# Altium PCB Wearable_ECG_230108U_230507R.PcbDoc (part 2 of 2)
Units mil, origin at the board's own origin, x right, y up, seen from the top; angles counter-clockwise.
Board outline 3795 x 1445 mil, 4 copper layers (Top Layer, L2_GND, L3_POWER, Bottom Layer), stack 62.449 mil thick; 68 components, 46 nets, 244 pads, 65 vias.
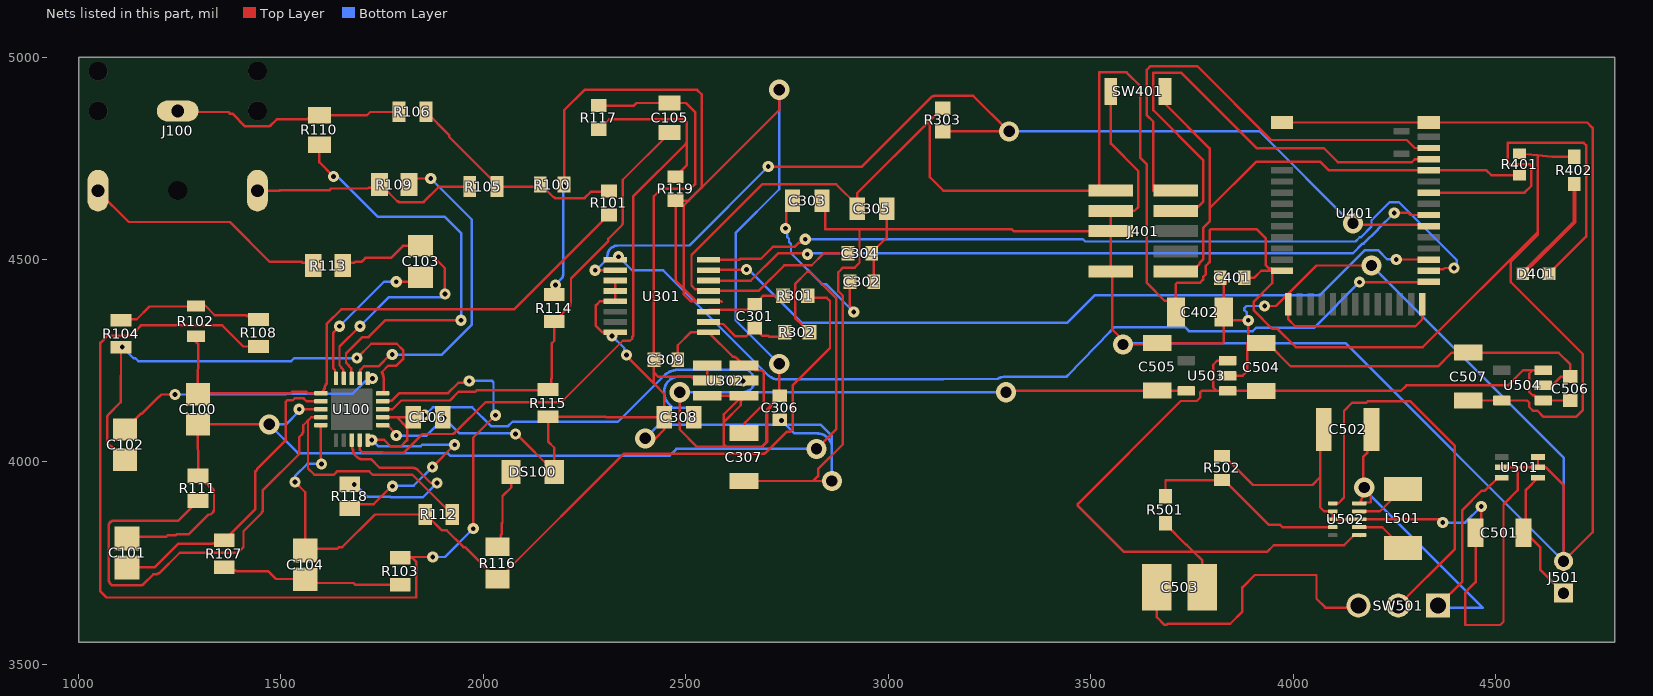
[diagram p4: the nets of this part, all layers, seen from the top]

## Via types
v1: diameter 27.56, hole 11.81, Top Layer to Bottom Layer, 52 vias
v2: diameter 50, hole 28, Top Layer to Bottom Layer, 13 vias

## Nets (pads, with @x,y where several pads share a name; then routed paths per layer and width w, separated by ;. In a path a pad name is that pad's centre, name@x,y a point inside that pad or via, vN(x,y) a via of type N, cw(c..) or ccw(c..) an arc to the next point about the centre after c; other vN are vias at no path point)
3.3V: C106.1 C302.1 C303.1 C306.2 C505.2 R100.1 R114.1 R118.1 R119.2 U100.15 U100.17 U301.12 U302.3 U302.4 U503.5 | length 7587.3
  Top Layer w6: R118.1@1670,3885.42 1678.15,3893.7 1682.09,3893.7 1683.07,3894.68 1696.85,3894.68 1697.83,3895.67 1729.33,3895.67 1773.62,3939.96 v1(1775.59,3939.96) ; U100.15@1714.37,4053.82 1714.37,4053 1714.57,4053.15 1715.55,4054.13 v1(1724.41,4054.13) ; U100.15@1716.54,4055.12 1717.52,4055.12 1718.5,4056.1 1720.47,4056.1 v1@1721.46,4057.09 ; v1@1724.41,4057.09 1727.36,4054.13 1755.21,4054.13 1771.12,4038.22 1796.09,4038.22 1811.78,4053.91 1811.78,4085.22 1786.72,4110.28 ; U100.17@1751.18,4110.32 1786.72,4110.28 ; C106.1@1826.77,4110.32 1826.77,4110.24 1816.93,4110.25 1815.94,4110.25 1813.01,4110.25 1786.72,4110.28 ; C106.1@1826.77,4113.19 1853.35,4113.19 v1(1855.32,4115.16) ; v1(1874.02,3987.2) v1(1929.13,4042.32) ; R114.1@2175,4413.5 2175.2,4434.06 v1(2178.15,4437.01) ; v1(2197.83,4681.1) 2197.83,4683.07 2199.8,4685.04 R100.1@2199.53,4685 2199.53,4868.53 2250,4919 2528,4919 2539,4908 2539,4677.47 2507,4645.47 R119.2@2475,4645.47 2475,4448 2495,4428 ; v2@2489.17,4170.28 2487.2,4170.28 2485.24,4172.24 v2(2485,4172) 2485,4080 2528,4037 2594,4037 ; U302.3@2553.11,4163.39 U302.4@2640,4163.39 ; 2588,4397 2526,4397 2495,4428 ; 2588.58,4395.67 U301.12@2555.94,4396.65 2512,4396.65 2495,4413.65 2495,4428 ; v2(2731,4242) C306.2@2731,4161.61 ; v2(2731,4919) 2731,4869 2495,4633 2495,4428 ; v1(2746.58,4576.87) 2747.88,4578.17 2747.88,4629.3 C303.1@2763.58,4645 ; C302.1@2905.47,4445 2905.47,4385.36 2915,4375.83 v1(2915,4370) ; v2(3291,4172) 3294.2,4175.2 U503.5@3736.22,4175.2 ; 2594,4037 2594,4117.39 U302.4@2640,4163.39 ; 2594,4037 2689,4037 2701,4049 2701,4129 C306.2@2724.14,4152.14 ; U302.4@2640,4163.39 U302.4@2643.7,4163.39 2639.76,4159.45 2639.76,4157.48 2637.8,4155.51 2637.8,4151.57 2635.83,4149.61 2635.83,4139.76 2594.49,4098.43 2594.49,4043.31 2600.39,4037.4 2687.01,4037.4 2698.82,4049.21 2698.82,4124.02 2700.79,4125.98 2700.79,4127.95 2702.76,4127.95 2702.76,4129.92 2704.72,4129.92 2704.72,4131.89 2706.69,4131.89 2706.69,4133.86 2708.66,4133.86 2708.66,4135.83 2710.63,4137.8 2710.63,4141.73 C306.2@2732.28,4163.39 C306.2@2731,4161.61 ; C306.2@2724.14,4152.14 2731,4159 C306.2@2731,4161.61 ; C306.2@2724.14,4152.14 C306.2@2731,4161.61
  Bottom Layer w6: v1(1724.41,4054.13) 1724.8,4054.13 1740.71,4038.22 1844.49,4038.22 1848.59,4042.32 v1(1929.13,4042.32) ; v1(1775.59,3939.96) 1776.57,3940.94 1827.76,3940.94 v1(1874.02,3987.2) ; v1(1855.32,4115.16) 1875.2,4135.05 1972.08,4135.05 2018.91,4088.22 2061.18,4088.22 2071.95,4099 2332.27,4099 2449.8,4216.54 2450.79,4216.54 2452.76,4218.5 2453.74,4218.5 2454.72,4219.49 2455.71,4219.49 2457.68,4221.46 2458.66,4221.46 2459.65,4222.44 2460.63,4222.44 2461.61,4223.43 2463.58,4223.43 2464.57,4224.41 2466.54,4224.41 2467.52,4225.39 2469.49,4225.39 2470.47,4226.38 2474.41,4226.38 2475.39,4227.36 2653.54,4227.36 2664.37,4216.54 2664.37,4215.55 2665.35,4214.57 2665.35,4213.58 2666.34,4212.6 2666.34,4211.61 2667.32,4210.63 2667.32,4209.65 2668.31,4208.66 2668.31,4204.72 2669.29,4203.74 2669.29,4195.87 2668.31,4194.88 2668.31,4190.94 2667.32,4189.96 2667.32,4188.98 2666.34,4187.99 2666.34,4187.01 2665.35,4186.02 2665.35,4185.04 2664.37,4184.06 2664.37,4183.07 2658.46,4177.17 2657.48,4177.17 2656.5,4176.18 2655.51,4176.18 2654.53,4175.2 2653.54,4175.2 2652.56,4174.21 2651.57,4174.21 2650.59,4173.23 2646.65,4173.23 2645.67,4172.24 2491.14,4172.24 2490.9,4172 v2(2485,4172) ; v1(2178.15,4437.01) 2178.15,4437.99 2195.87,4455.71 2195.87,4459.65 2197.83,4461.61 v1(2197.83,4681.1) ; 2650.59,4172 v2(3291,4172) ; v2(2731,4242) 2623.22,4349.78 2623.22,4565.75 2731,4673.53 v2(2731,4919) ; v1(2746.58,4576.87) 2750.7,4572.74 2750.7,4555.32 2754.94,4551.09 2754.94,4543.47 2760,4538.41 2760,4515.26 2836.24,4439.02 2845.98,4439.02 v1(2915,4370)
ADC_CS: R303.1 U301.2 U401.30 | length 2590.2
  Top Layer w6: v1@2278.54,4473.43 U301.2@2325.94,4473.43 ; v1(2703.74,4729.33) 2935.04,4729.33 3108.27,4902.56 3109.25,4902.56 3110.24,4903.54 3112.2,4903.54 3113.19,4904.53 3209.65,4904.53 3298.23,4815.94 v2(3298.72,4816.28) R303.1@3135,4816.28 ; v2(4148.34,4589.15) 4151.76,4585.74 4331.59,4585.74 U401.30@4335,4582.32
  Bottom Layer w6: v1@2278.54,4473.43 2306.1,4500.98 2306.1,4510.83 2307.09,4511.81 2307.09,4515.75 2308.07,4516.73 2308.07,4517.72 2309.06,4518.7 2309.06,4519.69 2310.04,4520.67 2310.04,4521.65 2311.02,4522.64 2311.02,4523.62 2316.93,4529.53 2317.91,4529.53 2318.9,4530.51 2319.88,4530.51 2320.87,4531.5 2321.85,4531.5 2322.83,4532.48 2323.82,4532.48 2324.8,4533.46 2328.74,4533.46 2329.72,4534.45 2508.86,4534.45 v1(2703.74,4729.33) ; v2(3298.72,4816.28) 3917.72,4816.28 4144.85,4589.15 v2(4148.34,4589.15)
  other v1: 2276.18,4473.43
ADC_DRDY: U301.14 U401.31 | length 1852.6
  Top Layer w6: U301.14@2555.94,4447.83 2660.71,4447.83 2727.87,4515 2798.13,4515 v1(2800.31,4512.82) ; v1(4250,4615) 4285.08,4615 4290.2,4609.88 U401.31@4335,4609.88
  Bottom Layer w6: v1(2800.31,4512.82) 2802.49,4515 4147.63,4515 4171.63,4539 4174.56,4539 4209.96,4574.4 4209.96,4574.96 v1(4250,4615)
DVDD_3V3: C304.1 C305.1 C401.1 C402.2 C507.1 J401.1 R303.2 R401.2 R402.2 U301.13 U401.11 U504.5 | length 5714.5
  Top Layer w6: C304.1@2900.47,4515 2840.37,4515 2811.1,4485.74 2743.58,4485.74 2680.09,4422.24 U301.13@2555.94,4422.24 2551.96,4426.23 2523.4,4426.23 2514.16,4435.47 2514.16,4511.39 2688.34,4685.56 2871.88,4685.56 C305.1@2923.58,4633.86 ; C305.1@2923.58,4625 C305.1@2923.58,4633.86 ; R303.2@3135,4873.72 3133.06,4873.72 3103,4843.65 ; J401.1@3549.88,4670 J401.1@3521,4670 ; C402.2@3710.95,4370 3710.95,4376.05 3710.05,4376.95 C402.2@3710.05,4379.38 ; C402.2@3726.65,4384 C402.2@3726.65,4384.76 ; C401.1@3879.53,4455 3904.53,4455 3921.62,4472.09 U401.11@3953,4472.09 ; U401.11@3972.8,4472.09 U401.11@3953.11,4472.09 ; C507.1@4433.07,4151.57 U504.5@4515.75,4151.57 4578.43,4151.57 4583.46,4146.54 4583.46,4135.55 4592.25,4126.76 4603.24,4126.76 4619,4111 4699,4111 4716,4128 4716,4266 4538,4444 4538,4494 4604.99,4560.99 4604.99,4567.99 ; R401.2@4560,4761.64 4603.81,4757.16 ; R402.2@4695,4753.46 4640,4753.46 4603.81,4757.16 ; C305.1@2923.58,4633.86 2923.58,4664.24 3103,4843.65 ; 3103,4843.65 3103,4703 3136,4670 J401.1@3521,4670 ; J401.1@3521,4670 3521,4962 3589,4962 3623,4928 3623,4751 3639,4735 3639,4441.95 3682.82,4398.12 3691.31,4398.12 C402.2@3710.05,4379.38 ; C402.2@3710.05,4379.38 3710.05,4438.92 3713.56,4442.43 3770.42,4442.43 3778.04,4450.05 3778.04,4456.41 3785,4463.37 3785,4484.38 3794.04,4493.42 3794.04,4546.58 3794.04,4571.49 3797.55,4575 3910,4575 3932.24,4552.76 3932.24,4486.39 3939.85,4478.77 3944.72,4478.77 3946.43,4478.77 U401.11@3953.11,4472.09 ; U401.11@3953.11,4472.09 3948.33,4467.31 3948.33,4441.21 3903.22,4396.09 3903.22,4373.91 3948.67,4328.45 3961.55,4328.45 4007,4283 4320,4283 4604.99,4567.99 ; 4603.81,4757.16 4604.99,4755.98 4604.99,4567.99
GND: C105.2 C106.2 C302.2 C303.2 C304.2 C305.2 C306.1 C307.1 C308.2 C309.1 C401.2 C402.1 C501.2 C502.1 C503.1 C504.2 C505.1 C506.2 C507.2 DS100.2 J401.3 J401.5 J401.9 J501.2 R115.1 R117.2 R502.1 SW401.2 SW501.3 U100.16 U301.3 U301.4 U301.5 U301.8 U302.1 U302.2 U401.1 U401.12 U401.24 U401.39 U501.2 U501.3 U501.5 U502.2 U502.3 U502.8 U503.2 U504.2 | length 15492.7
  Top Layer w6: U100.16@1751.18,4090.63 1762.6,4090.63 1785,4068.23 v1(1785,4065) ; C106.2@1899.61,4110.32 1901.57,4108.27 v1(1902.56,4108.27) ; v1(2079.72,4068.9) 2081.69,4068.9 DS100.2@2175,3975.59 ; R117.2@2285,4880 2372,4880 2378.42,4886.42 C105.2@2460,4886.42 2500.58,4886.42 2523,4864 2523,4686 2512,4675 2440.26,4675 2421.26,4656 C309.1@2421.26,4251.97 2421.26,4220.74 ; v1(2317.91,4311.02) 2323.82,4316.93 2323.82,4317.91 U301.8@2325.94,4319.88 2294.12,4319.88 2278,4336 2278,4386.65 2288,4396.65 U301.5@2325.94,4396.65 U301.4@2325.94,4422.24 U301.3@2325.94,4447.83 ; v1(2353.35,4263.78) 2353.35,4261.81 2421.26,4193.9 2421.26,4193.59 ; v2(2400,4058) 2424.85,4058 2446.85,4080 C308.2@2446.85,4110.24 ; U302.1@2553.11,4238.19 U302.2@2553.11,4200.79 2523,4200.79 2513.79,4210 2432,4210 2421.26,4220.74 ; C307.1@2643.7,3952.76 2814.76,3952.76 ; C306.1@2732.28,4104.33 2734.25,4102.36 v1(2736.22,4102.36) ; C303.2@2836.42,4645 2844.49,4636.93 2844.49,4575 2929.22,4575 ; v2(2861,3952.76) 2814.76,3952.76 ; C304.2@2959.53,4515 2964.53,4510 C302.2@2964.53,4445 ; C304.2@2959.53,4516.97 2996.42,4553.86 2996.42,4575 ; C305.2@2996.42,4625 2996.42,4575 ; SW401.2@3550,4915 3550,4786 3618,4718 3618,4630 3608,4620 J401.3@3549.88,4620 J401.5@3549.88,4570 ; C503.1@3663.89,3690 3663.89,3616.11 3682.51,3597.49 3687.49,3597.49 3690,3600 3845,3600 3875,3630 3875,3690 3905.47,3720.47 4058.05,3720.47 4058.05,3661.95 4080,3640 4156.58,3640 SW501.3@4161.58,3645 ; C505.1@3665,4293.31 3825.54,4293.31 3829.06,4296.82 C402.1@3829.06,4369.27 ; C505.1@3665,4294.06 3660.94,4290 v2(3580,4290) 3580,4300.33 3554,4326.33 3554,4465.88 J401.9@3549.88,4470 J401.5@3549.88,4570 ; R502.1@3825,4014.53 3829.92,4014.53 3901.53,3942.91 4048,3942.91 4066.93,3961.84 ; C401.2@3835.47,4445 3829.06,4438.58 C402.1@3829.06,4370 C402.1@3829.06,4369.27 ; U503.2@3838.58,4212.6 3875.6,4212.6 3887,4224 3887,4293.31 C504.2@3906.31,4293.31 ; v1(3930,4385) 3957.88,4385 4057.88,4485 v2(4194,4485) ; U401.1@3960,4838.23 U401.1@3972.8,4838.23 U401.39@4335,4838.23 4726.77,4838.23 4740,4825 4740,3826.02 J501.2@4668.35,3754.37 4668.35,3942.65 4624.58,3986.42 U501.2@4605.24,3986.42 ; U401.12@3988.54,4389.41 3988.54,4352 4005.54,4335 4302.25,4335 4319.25,4352 U401.24@4319.25,4389.41 ; C502.1@4066.93,4027.56 4066.93,3961.84 ; v1(4370,3850) 4370,3855 4368.63,3856.37 4366.73,3858.27 U502.8@4155.51,3858.27 U502.3@4098.43,3858.27 U502.2@4098.43,3877.95 4076.98,3877.95 4066.93,3888 4066.93,3961.84 ; v1(4465,3890) 4465,3839.06 C501.2@4450.94,3825 4450.94,3702.82 4425,3676.87 4425,3597 4512,3597 4520,3605 4520,3895 4555,3930 4555,3985 ; U501.5@4515.74,3986.42 U501.2@4605.24,3986.42 ; U501.3@4605.24,4012.01 U501.2@4605.24,3986.42 ; U504.2@4618.11,4188.98 4640,4188.98 4661.65,4210.63 C506.2@4685.04,4210.63 4685.04,4240.65 4656,4269.69 C507.2@4433.07,4269.69 4391.69,4269.69 4358,4236 3994.31,4236 3937,4293.31 C504.2@3921.26,4293.31 C504.2@3906.31,4293.31 ; DS100.2@2175,3975.59 DS100.2@2175,3975 2175.2,3975.39 DS100.2@2175,3975.59 ; DS100.2@2175,3975.59 2175,4035 2160,4050 R115.1@2160,4111.5 2302,4111.5 2303.27,4110.24 C308.2@2446.85,4110.24 ; 2421.26,4193.59 2446.85,4168 C308.2@2446.85,4110.24 ; 2421.26,4193.59 2421.26,4220.74 ; 2814.76,3952.76 2827,3965 2827,3982.26 2888.22,4043.48 2888.22,4410.4 2876.72,4421.9 2876.72,4468.1 2888.62,4480 2917.32,4480 2929.22,4491.9 2929.22,4575 ; 2929.22,4575 2996.42,4575 ; 2996.42,4575 3305,4575 3310,4570 J401.5@3549.88,4570 ; C402.1@3829.06,4369.27 3848.69,4349.63 3884.26,4349.63 3889.63,4355 v1(3889.63,4349.63) 3889.63,4309.99 C504.2@3906.31,4293.31
  Bottom Layer w6: v1(1785,4065) 1859.29,4065 v1(1902.56,4108.27) 1939.96,4070.87 2077.76,4070.87 v1(2079.72,4068.9) ; v1(2317.91,4311.02) 2348.43,4280.51 2348.43,4268.7 v1(2353.35,4263.78) ; v2(2400,4058) 2434,4092 2746.58,4092 ; v1(2736.22,4102.36) 2746.58,4092 ; v2(3580,4290) 3583.31,4293.31 4129.41,4293.31 J501.2@4668.35,3754.37 4668.35,4010.65 v2(4194,4485) ; v1(3889.63,4349.63) 3885.5,4353.75 3885.5,4369.53 3880,4375.03 3880,4380 3885,4385 v1(3930,4385) ; v1(4370,3850) 4425,3850 v1(4465,3890) ; 2746.58,4092 2833,4092 2861,4064 2861,4040.57 ; 2746.58,4092 2767.72,4070.87 2826.77,4070.87 2827.76,4069.88 2832.68,4069.88 2833.66,4068.9 2835.63,4068.9 2836.61,4067.91 2838.58,4067.91 2839.57,4066.93 2840.55,4066.93 2841.54,4065.94 2842.52,4065.94 2843.5,4064.96 2844.49,4064.96 2847.44,4062.01 2848.43,4062.01 2853.35,4057.09 2853.35,4056.1 2855.32,4054.13 2855.32,4053.15 2857.28,4051.18 2857.28,4050.2 2858.27,4049.21 2858.27,4048.23 2859.25,4047.24 2859.25,4045.28 2860.24,4044.29 2860.24,4041.34 2861,4040.57 ; 2861,4040.57 2861.22,4040.35 2861.22,3952.76 v2(2861,3952.76) 2861,4040.57
MCU_RESET_N: J401.10 R401.1 SW401.1 U401.35 | length 1376
  Top Layer w6: SW401.1@3683.86,4915 3683.86,4884.53 3794.04,4774.35 3794.04,4626.43 ; J401.10@3710.12,4470 3750.47,4470 3769,4488.53 3769,4491.01 3778.04,4500.05 3778.04,4539.95 3778.04,4578.11 3794.04,4594.11 3794.04,4626.43 ; R401.1@4560,4708.36 4489.76,4708.36 4478,4720.12 U401.35@4335,4720.12 4088.88,4720.12 4068,4741 3908.61,4741 3794.04,4626.43
MCU_STATUS_LED: D401.1 U401.33 | length 975.4
  Top Layer w6: U401.33@4335,4665 4571.99,4665 4588.99,4682 4588.99,4735 4531,4735 4531,4788 4718,4788 4724,4782 4724,4556.52 D401.1@4632.48,4465
NetC100_1: C100.1 R101.2 R102.2 U100.6 | length 1440.5
  Top Layer w6: R102.2@1290,4310.2 1289.37,4311.02 1289.37,4297.24 1295.28,4291.34 C100.1@1295,4167.4 1295.28,4167.32 1297.24,4169.29 1523.79,4169.29 1527.28,4172.78 1562.72,4172.78 1566.14,4169.36 U100.6@1598.82,4169.37 1606.3,4177.17 1606.3,4179.13 1608.27,4181.1 1608.27,4187.01 1610.24,4188.98 1610.24,4190.94 1612.75,4193.46 1612.75,4340.62 1648.91,4376.78 2075.6,4376.78 2309.05,4610.24 R101.2@2310,4610
NetC101_2: C101.2 R107.2 U100.7 | length 766
  Top Layer w6: C101.2@1120,3739.34 1120.08,3740.16 1188.98,3740.16 1246.06,3797.24 1330.71,3797.24 1332.68,3799.21 1346.46,3799.21 1348.43,3801.18 1352.36,3801.18 1354.33,3803.15 1356.3,3803.15 R107.2@1360,3806.93 1360.24,3807.09 1437.01,3883.86 1437.01,3976.38 1440.94,3980.32 1440.94,3982.28 1511.52,4052.86 1511.52,4147.74 1516.04,4152.26 1529.39,4152.26 1533.91,4156.78 1556.09,4156.78 1563.19,4149.69 U100.7@1598.82,4149.69
NetC102_1: C102.1 U100.1 | length 675.6
  Top Layer w6: C102.1@1115,4080 1154.53,4119.09 1156.5,4119.09 1197.83,4160.43 1198.82,4160.43 1204.72,4166.34 v1(1238.19,4166.34) ; U100.1@1714.37,4206.18 1714.57,4205.71 v1(1726.38,4205.71)
  Bottom Layer w6: v1(1238.19,4166.34) 1511.81,4166.34 1513.78,4168.31 1677.17,4168.31 1708.66,4199.8 1720.47,4199.8 v1(1726.38,4205.71)
NetC102_2: C102.2 R104.1 U100.20 | length 1191.6
  Top Layer w6: v1(1108.27,4283.46) R104.1@1105,4283 1104.33,4147.64 1072.83,4116.14 1072.83,4114.17 1070.87,4112.2 1070.87,4047.24 1072.83,4045.28 1072.83,4043.31 1076.77,4039.37 1078.74,4039.37 1080.71,4037.4 1082.68,4037.4 1114.17,4005.91 C102.2@1115,4005.2 ; v1(1687.53,4256.34) 1722.97,4291.78 1786.09,4291.78 1801.78,4276.09 1801.78,4253.91 1785.55,4237.68 1765.24,4237.68 1749.02,4221.46 1750,4220.47 1750,4219.49 1750.98,4218.5 1750.98,4217.52 1751.97,4216.54 1751.97,4215.55 1752.95,4214.57 1752.95,4210.63 1753.94,4209.65 1753.94,4172.24 1750.98,4169.29 U100.20@1751.18,4169.37
  Bottom Layer w6: v1(1108.27,4283.46) 1135.83,4255.91 1140.75,4255.91 1147.64,4249.02 1525.59,4249.02 1532.91,4256.34 v1(1687.53,4256.34)
NetC103_1: C103.1 R113.2 U100.4 | length 755.2
  Top Layer w6: R113.2@1652.83,4485 1659.45,4490.16 1665.35,4490.16 1667.32,4492.13 1681.1,4492.13 1683.07,4494.09 1698.82,4494.09 1708.66,4503.94 1771.65,4503.94 1801.18,4533.46 1849.84,4533.46 1905,4478.31 v1(1905,4415) ; U100.4@1655.32,4206.18 1653.75,4207.75 1653.75,4228.19 1649.51,4232.43 1649.51,4233.85 1644.75,4238.62 1644.75,4284.75 v1(1695,4335)
  Bottom Layer w6: v1(1695,4335) 1767.06,4407.06 1897.06,4407.06 v1(1905,4415)
NetC103_2: C103.2 U100.5 | length 388.4
  Top Layer w6: U100.5@1635.63,4206.18 1633.51,4208.3 1633.51,4227.22 1628.75,4231.99 1628.75,4318.75 v1(1645,4335) ; v1(1785,4445) 1834.37,4445 C103.2@1845,4455.63
  Bottom Layer w6: v1(1645,4335) 1755,4445 v1(1785,4445)
NetC104_2: C104.2 R103.1 R107.1 | length 453.5
  Top Layer w6: R107.1@1360,3740 1364.17,3736.22 1366.14,3736.22 1368.11,3734.25 1372.05,3734.25 1374.02,3732.28 1387.8,3732.28 1389.76,3730.32 1468.5,3730.32 1488.19,3710.63 1559.06,3710.63 C104.2@1560,3710 1562.99,3706.69 1564.96,3706.69 1566.93,3704.72 1570.87,3704.72 1572.83,3702.76 1586.61,3702.76 1588.58,3700.79 1679.13,3700.79 1683.07,3696.85 1795.28,3696.85 R103.1@1795,3696.54
NetC105_1: C105.1 R114.2 R115.2 U100.18 | length 1189.4
  Top Layer w6: U100.18@1751.18,4130 1775.59,4129.92 1797.24,4151.57 1917.32,4151.57 1938.98,4173.23 1980.32,4173.23 1984.25,4177.17 2157.48,4177.17 2159.45,4179.13 R115.2@2160,4178.5 2165.35,4185.04 2165.35,4190.94 2167.32,4192.91 2167.32,4204.72 2169.29,4206.69 2169.29,4293.31 2175.2,4299.21 2175.2,4346.46 R114.2@2175,4346.5 2214.57,4385.83 2214.57,4391.73 2216.54,4393.7 2216.54,4452.76 2309.06,4545.28 2309.06,4551.18 2342.52,4584.65 2342.52,4586.61 2344.49,4588.58 2344.49,4696.85 2460.63,4812.99 C105.1@2460,4813.58
NetC301_1: C301.1 R301.2 U301.11 | length 204.1
  Top Layer w6: U301.11@2555.94,4371.06 2555.12,4372.05 2559.06,4375.98 2651.77,4375.98 2652.57,4376.78 2656.78,4376.78 C301.1@2670,4390 ; C301.1@2670,4389.53 2671.97,4389.53 2684.72,4402.28 2684.72,4404.24 2690.47,4410 R301.2@2740.84,4410
NetC301_2: C301.2 R302.2 U301.10 | length 216.3
  Top Layer w6: U301.10@2555.94,4345.47 2555.12,4344.49 2557.09,4342.52 2582.68,4342.52 2584.65,4340.55 2592.52,4340.55 2623.07,4310 2649.53,4310 2655.28,4315.76 2655.28,4317.72 2668.03,4330.47 2671.97,4330.47 2684.72,4317.72 2684.72,4315.76 2689.45,4311.02 2703.98,4311.02 2705.95,4309.06 R302.2@2736.22,4309.06
NetC308_1: C308.1 U302.5 | length 340.4
  Top Layer w6: v1(2515.75,4121.06) 2515.75,4117.13 2516.73,4116.14 2516.73,4114.17 2517.72,4113.19 2517.72,4112.2 C308.1@2519.69,4110.24 ; v1(2641.73,4199.8) 2642.72,4199.8 U302.5@2643.7,4200.79
  Bottom Layer w6: v1(2515.75,4121.06) 2502.95,4133.86 2467.52,4133.86 2455.71,4145.67 2455.71,4146.65 2452.76,4149.61 2452.76,4150.59 2450.79,4152.56 2450.79,4153.54 2449.8,4154.53 2449.8,4156.5 2448.82,4157.48 2448.82,4158.46 2447.83,4159.45 2447.83,4162.4 2446.85,4163.39 2446.85,4181.1 2447.83,4182.09 2447.83,4184.06 2448.82,4185.04 2448.82,4187.01 2449.8,4187.99 2449.8,4188.98 2450.79,4189.96 2450.79,4190.94 2451.77,4191.93 2451.77,4192.91 2453.74,4194.88 2453.74,4195.87 2461.61,4203.74 2462.6,4203.74 2463.58,4204.72 2464.57,4204.72 2466.54,4206.69 2467.52,4206.69 2468.5,4207.68 2470.47,4207.68 2471.46,4208.66 2473.43,4208.66 2474.41,4209.65 2478.35,4209.65 2479.33,4210.63 2630.91,4210.63 v1(2641.73,4199.8)
NetD401_2: D401.2 R402.1 | length 274.3
  Top Layer w10: D401.2@4567.52,4465 4695,4592.48 R402.1@4695,4686.54
NetDS100_1: DS100.1 R116.1 | length 198.5
  Top Layer w6: R116.1@2035,3790.42 2039.37,3795.28 2039.37,3797.24 2041.34,3799.21 2041.34,3803.15 2043.31,3805.12 2043.31,3818.9 2045.28,3820.87 2045.28,3848.43 2047.24,3850.39 2047.24,3915.35 2068.9,3937.01 2068.9,3974.41 DS100.1@2068.7,3975
NetJ100_1: J100.1 R106.1 R110.1 | length 579.3
  Top Layer w6: J100.1@1245,4866.85 1244.09,4866.14 1246.06,4864.17 1370.08,4864.17 1374.02,4860.24 1379.92,4860.24 1411.42,4828.74 1470.47,4828.74 1472.44,4830.71 1474.41,4830.71 1490.16,4846.46 1564.96,4846.46 1566.93,4848.43 1580.71,4848.43 1582.68,4850.39 1586.61,4850.39 1588.58,4852.36 1590.55,4852.36 R110.1@1595,4856.42 1712.6,4856.3 1720.47,4864.17 1791.34,4864.17 R106.1@1791.5,4865
NetJ100_2: J100.2 R113.1 | length 610.2
  Top Layer w6: J100.2@1048.15,4670 1047.24,4669.29 1124.02,4592.52 1374.02,4592.52 1472.44,4494.09 1551.18,4494.09 1553.15,4492.13 1566.93,4492.13 1568.9,4490.16 1572.83,4490.16 1574.8,4488.19 1576.77,4488.19 R113.1@1580,4485
NetJ100_3: J100.3 R105.1 R109.1 | length 567.5
  Top Layer w6: J100.3@1441.85,4670 1440.94,4669.29 1496.06,4669.29 1498.03,4671.26 1620.08,4671.26 1624.02,4675.2 1714.57,4675.2 1716.54,4677.17 1730.32,4677.17 1732.28,4679.13 1736.22,4679.13 1738.19,4681.1 1740.16,4681.1 R109.1@1743.58,4685 1748.03,4681.1 1750,4681.1 1787.4,4643.7 1789.37,4643.7 1791.34,4641.73 1852.36,4641.73 1889.76,4679.13 1966.54,4679.13 R105.1@1966.5,4680
NetL501_1: L501.1 U502.7 | length 129.5
  Top Layer w6: U502.7@4163.39,3838.58 4220.47,3838.58 L501.1@4271.65,3787.4
NetL501_2: L501.2 U502.9 | length 131.1
  Top Layer w6: U502.9@4163.39,3877.95 4214.57,3877.95 4267.72,3931.1 4269.69,3931.1 L501.2@4271.65,3933.07
NetR100_2: R100.2 R101.1 R105.2 R106.2 | length 559.3
  Top Layer w6: R106.2@1858.5,4865 1915.35,4807.09 1915.35,4803.15 2029.53,4688.98 2029.53,4687.01 2031.5,4685.04 2031.5,4681.1 2033.46,4679.13 R105.2@2033.5,4680 2133.86,4679.13 2139.76,4685.04 R100.2@2140.47,4685 2153.54,4671.26 2155.51,4671.26 2173.23,4653.54 2175.2,4653.54 2177.17,4651.57 2250,4651.57 2265.75,4667.32 2307.09,4667.32 2309.06,4669.29 R101.1@2310,4669.06
NetR102_1: R102.1 R104.2 R108.2 | length 371.3
  Top Layer w6: R104.2@1105,4350 1104.33,4350.39 1106.3,4352.36 1143.7,4352.36 1175.2,4383.86 1287.4,4383.86 R102.1@1290,4385 1289.37,4385.83 1312.99,4385.83 1336.61,4362.2 1415.35,4362.2 1417.32,4360.24 1431.1,4360.24 1433.07,4358.27 1437.01,4358.27 1438.98,4356.3 1440.94,4356.3 R108.2@1445,4352
NetR103_2: R103.2 R108.1 U100.19 | length 2854.3
  Top Layer w6: R108.1@1445,4285 1407,4285 1355,4337 1154,4337 1129,4312 1072,4312 1054,4294 1054,3680 1069,3665 1834,3665 1834,3753.46 1824,3763.46 R103.2@1795,3763.46 1796.54,3765 v1(1875,3765) ; U100.19@1751.18,4149.69 1752.75,4151.25 1774.29,4151.25 1793.04,4170 1913.12,4170 1938.12,4195 1960,4195 v1(1965,4200.01) ; v1(1975,3835) 1975,4060 v1(2030,4115)
  Bottom Layer w6: v1(1875,3765) 1905,3765 v1(1975,3835) ; v1(1965,4200.01) 2021.49,4200.01 2025,4196.49 2025,4120 v1(2030,4115)
NetR109_2: R109.2 U100.2 | length 806.6
  Top Layer w6: U100.2@1694.69,4206.18 1696.25,4207.75 1696.25,4227.35 1704.62,4235.72 1740.65,4235.72 1769.93,4265 v1(1775,4265) ; R109.2@1816.42,4685 1831.42,4700 v1(1870,4700)
  Bottom Layer w6: v1(1775,4265) 1897.87,4265 1971.78,4338.91 1971.78,4598.22 v1(1870,4700)
NetR110_2: R110.2 U100.3 | length 1068.8
  Top Layer w6: R110.2@1595,4783.58 1595,4740 v1(1630,4705) ; U100.3@1675,4206.18 1673.43,4207.75 1673.43,4231.14 1667.63,4236.94 1667.63,4238.36 1660.75,4245.24 1660.75,4267.43 1701.54,4308.22 1716.73,4308.22 1758.51,4350 v1(1945,4350)
  Bottom Layer w6: v1(1630,4705) 1632.51,4707.51 1637.49,4707.51 1740,4605 1905,4605 1945,4565 v1(1945,4350)
NetR111_1: R111.1 R112.2 U100.9 | length 1704.2
  Top Layer w6: R111.1@1295,3904.45 1295.28,3903.54 1246.06,3854.33 1082.68,3854.33 1080.71,3852.36 1078.74,3852.36 1076.77,3850.39 1076.77,3848.43 1074.8,3846.46 1074.8,3704.72 1076.77,3702.76 1076.77,3700.79 1082.68,3694.88 1155.51,3694.88 1157.48,3696.85 1159.45,3696.85 1185.04,3722.44 1194.88,3722.44 1196.85,3724.41 1198.82,3724.41 1250,3775.59 1391.73,3775.59 1393.7,3777.56 1395.67,3777.56 1407.48,3789.37 1407.48,3828.74 1452.76,3874.02 1452.76,3875.98 1454.72,3877.95 1454.72,3929.13 1545.28,4019.69 1545.28,4061.02 1553.15,4068.9 1553.15,4070.87 1555.12,4072.83 1555.12,4090.55 1564.96,4100.39 1566.93,4102.36 1574.8,4110.24 U100.9@1598.82,4110.32 ; 1566.93,4098.43 1566.93,3983.83 1582.54,3968.22 1630.69,3968.22 1638.86,3976.39 1718.09,3976.39 1726.23,3968.25 1825.06,3968.25 1923.23,3870.08 R112.2@1923.46,3870
NetR117_1: R117.1 R119.1 U100.14 | length 1732.5
  Top Layer w6: U100.14@1694.69,4053.82 1694.88,4029.53 1700.79,4023.62 1751.05,4023.62 1752.45,4022.22 1802.72,4022.22 1849.4,4068.9 1925.2,4068.9 1927.17,4070.87 1929.13,4070.87 2005.91,4147.64 2190.94,4147.64 2192.91,4149.61 2194.88,4149.61 2344.49,4299.21 2362.2,4299.21 2368.11,4305.12 2368.11,4309.06 2370.08,4311.02 2370.08,4655.51 2500,4785.43 2500,4787.4 ; R117.1@2285,4820.94 2285.51,4820.94 2311.02,4846.46 2494.09,4846.46 2496.06,4844.49 2498.03,4844.49 2500,4842.52 2500,4840.55 2501.97,4838.58 2501.97,4789.37 2501.97,4785.43 2501.97,4732.28 2474.41,4704.72 R119.1@2475,4704.53
NetR118_2: R118.2 U100.13 | length 516.3
  Top Layer w6: R118.2@1670,3944.58 1680.12,3944.88 v1(1681.1,3943.9) ; U100.13@1675,4053.82 1675.2,4054.13 1676.18,4053.15 1676.18,4032.48 1677.17,4031.5 1677.17,4030.51 1678.15,4029.53 1678.15,4025.59 1679.13,4024.61 1679.13,4022.64 1680.12,4021.65 1680.12,4020.67 1682.09,4018.7 1682.09,4017.72 1688.98,4010.83 1689.96,4010.83 1691.93,4008.86 1692.91,4008.86 1693.9,4007.87 1695.87,4007.87 1696.85,4006.89 1722.44,4006.89 1744.09,3985.24 1828.74,3985.24 1829.72,3984.25 1831.69,3984.25 1832.68,3983.27 1833.66,3983.27 1835.63,3981.3 1836.61,3981.3 1870.08,3947.83 v1(1885.83,3947.83)
  Bottom Layer w6: v1(1681.1,3943.9) 1683.07,3943.9 1713.58,3913.39 1770.67,3913.39 1771.65,3912.4 1850.39,3912.4 v1(1885.83,3947.83)
NetR501_1: R501.1 R502.2 U502.4 | length 501.7
  Top Layer w6: R501.1@3685,3915 3685,3954.37 3823.9,3954.37 R502.2@3825,3955.47 3829.92,3955.47 3940.9,3844.49 3968.5,3844.49 3974.41,3838.58 U502.4@4098.43,3838.58
NetSW501_2: SW501.2 U502.1 | length 1029.6
  Top Layer w6: U502.1@4098.43,3897.64 4112,3897.64 4126,3911.64 4126,4126 4146.15,4146.15 4181.15,4146.15 4185,4150 4289,4150 4400,4039 4400,3785 SW501.2@4260,3645
REFOUT: C100.2 C101.1 R111.2 R302.1 U100.8 | length 2858.7
  Top Layer w6: C101.1@1120,3810.66 1120.08,3811.02 1124.02,3814.96 1216.54,3814.96 1220.47,3818.9 1240.16,3818.9 1242.13,3820.87 1271.65,3820.87 1320.87,3870.08 1326.77,3870.08 1332.68,3875.98 1332.68,3877.95 1334.65,3879.92 1334.65,3929.13 1332.68,3931.1 1332.68,3933.07 1326.77,3938.98 1322.83,3938.98 R111.2@1295,3965.55 1295.28,3966.54 C100.2@1295,4092.6 v2(1471,4092.6) ; v1(1545,4130) U100.8@1598.82,4130 ; R302.1@2805.58,4320 2805.58,4321.05 2791.67,4334.96 2790.62,4334.96 2770,4355.58 2770,4439.75 2799.99,4469.74 2806.26,4469.74 2872.22,4403.77 2872.22,4081.22 v2(2823,4032)
  Bottom Layer w6: v1(1545,4130) 1545,4125 1512.6,4092.6 v2(1471,4092.6) 1541.82,4021.78 1911.81,4021.78 1918.04,4015.54 2460.44,4015.54 2476.9,4032 v2(2823,4032)
SIGNAL_OUT: C104.1 R112.1 R116.2 R301.1 U100.10 | length 2249
  Top Layer w6: v1(1535,3950) 1560,3925 1560,3785.43 C104.1@1560,3782.44 ; C104.1@1560,3780.87 C104.1@1560,3782.44 ; U100.10@1598.82,4090.63 1598.82,3997.5 1600,3996.32 v1(1600,3995) ; R112.1@1856.54,3870 R112.1@1856.38,3870 ; R301.1@2794.44,4405 2848.37,4405 2856.22,4397.15 2856.22,4281.22 2763.78,4188.78 2763.78,4080.71 2757.87,4074.8 2750,4074.8 2696.85,4021.65 2694.88,4021.65 2692.91,4019.69 2346.46,4019.69 2035.43,3708.66 R116.2@2035,3709.58 1954.72,3789.37 1950.79,3789.37 1909.45,3830.71 1897.64,3830.71 1860.24,3868.11 1858.27,3868.11 R112.1@1856.38,3870 ; C104.1@1560,3782.44 1562.99,3785.43 1639.76,3785.43 1643.7,3789.37 1651.57,3789.37 1732.28,3870.08 R112.1@1856.38,3870
  Bottom Layer w6: v1(1535,3950) 1535,3965 1565,3995 v1(1600,3995)
SPI_MISO: U301.15 U401.27 | length 1919.1
  Top Layer w6: U301.15@2555.94,4473.43 2556.73,4474.21 2649.21,4474.21 v1(2650,4475) ; v1(4255,4500) 4255.18,4499.82 U401.27@4335.18,4499.82 ; U401.27@4335,4499.65 U401.27@4335.35,4500
  Bottom Layer w6: v1(2650,4475) 2654.99,4475.01 2786.78,4343.22 3442.18,4343.22 3510.74,4411.78 4067.04,4411.78 4178.26,4523 4209.74,4523 4232.22,4500.52 4254.48,4500.52 v1(4255,4500)
SPI_MOSI: U301.16 U401.26 | length 2072.2
  Top Layer w6: U301.16@2555.94,4499.02 2632.32,4499.02 2635.08,4501.78 2685.68,4501.78 2714.9,4531 2768.53,4531 2779.31,4541.78 2791.49,4541.78 2795,4545.29 v1(2795,4550) ; U401.26@4335,4472.09 4338.63,4475.72 4371.56,4475.72 4374.68,4478.84 v1(4397.89,4478.84)
  Bottom Layer w6: v1(2795,4550) 3481.29,4550 3486.96,4544.32 4154.33,4544.32 4165.01,4555 4167.93,4555 4193.96,4581.03 4193.96,4596.83 4238.91,4641.78 4261.09,4641.78 4405,4497.87 4405,4490 4397.89,4482.89 v1(4397.89,4478.84)
SPI_SCK: U301.1 U401.25 | length 2247.6
  Top Layer w6: U301.1@2325.94,4499.02 v1(2333.66,4506.89) ; v1(4164.37,4443.9) 4333.66,4443.9 4334.65,4444.88 U401.25@4335,4444.53
  Bottom Layer w6: v1(2333.66,4506.89) 2367.13,4473.43 2443.9,4473.43 2704.72,4212.6 2705.71,4212.6 2708.66,4209.65 2709.65,4209.65 2710.63,4208.66 2711.61,4208.66 2712.6,4207.68 2713.58,4207.68 2714.57,4206.69 2715.55,4206.69 2716.54,4205.71 2718.5,4205.71 2719.49,4204.72 2721.46,4204.72 2722.44,4203.74 3135.83,4203.74 3136.81,4204.72 3269.68,4204.72 3270.67,4205.71 3271.65,4205.71 3272.64,4206.69 3273.62,4206.69 3274.61,4207.68 3276.57,4207.68 3277.56,4208.66 3279.53,4208.66 3280.51,4209.65 3284.45,4209.65 3285.43,4210.63 3438.46,4210.63 3440.94,4210.63 3444.46,4214.14 3547.62,4321.35 3548.13,4321.87 3559.26,4333 3732.78,4333 3742.94,4322.85 3900.72,4322.85 3909.57,4331.69 4047.19,4331.69 4052.17,4331.69 4053.92,4333.45 v1(4164.37,4443.9)
SWDCLK: J401.4 U401.36 | length 1222.2
  Top Layer w6: J401.4@3710.12,4620 3756.04,4620 3778.04,4642 3778.04,4745.6 3655.11,4868.53 3655.11,4961.47 3723.53,4961.47 3910,4775 4076,4775 4111,4740 4293.32,4740 4301,4747.68 U401.36@4335,4747.68
SWDIO: J401.2 U401.37 | length 1143.6
  Top Layer w6: J401.2@3710.12,4670 3655,4670 3655,4840 3639.11,4855.89 3639.11,4968.57 3648,4977.47 3763.53,4977.47 3946,4795 4281,4795 4300.76,4775.24 U401.37@4335,4775.24
VBAT: C501.1 J501.1 U501.1 | length 336.2
  Top Layer w6: U501.1@4605.24,3960.83 4575.24,3930.83 4575.24,3824.53 4610.24,3789.53 4610.24,3733.74 J501.1@4668.35,3675.63
VBAT_PROT: C502.2 SW501.1 U501.6 U502.10 | length 1116
  Top Layer w6: v2@4175.75,3932.75 4192,3916.5 4192,3900.5 U502.10@4163.39,3897.64 4167.32,3901.57 4167.32,3903.54 4169.29,3905.51 4169.29,3909.45 4171.26,3911.42 4171.26,3925.2 4173.23,3927.17 4173.23,4011.81 4183.07,4021.65 4183.07,4025.59 C502.2@4185.04,4027.56 ; SW501.1@4358.43,3645 4418.26,3704.83 4418.26,3881.13 4466.09,3928.96 4474.12,3928.96 4505.99,3960.83 U501.6@4507.52,3960.83
  Bottom Layer w6: v2@4175.75,3932.75 4468.5,3640 4363.43,3640 SW501.1@4358.43,3645
  other v2: 4175.75,3936.69
VBOOST_3V6: C503.2 C504.1 C506.1 R501.2 U502.6 U503.1 U503.3 U504.1 U504.3 | length 2532
  Top Layer w6: R501.2@3685,3848.07 3685,3846.1 3736.34,3794.76 3737.52,3794.76 3754.72,3777.56 ; C503.2@3776.11,3690 3776.11,3756.17 3754.72,3777.56 ; U503.3@3838.58,4250 3813,4250 3803,4240 3803,4184 3811.8,4175.2 ; C504.1@3921.26,4175.2 U503.1@3838.58,4175.2 3811.8,4175.2 ; C504.1@3922,4175.2 4266.2,4175.2 4280,4189 4531,4189 4568.38,4226.38 4592,4226.38 ; U502.6@4165.76,3816.53 U502.6@4163.39,3818.9 4151,3818.9 4126.1,3794 3952.33,3794 3935.89,3777.56 3754.72,3777.56 ; U504.3@4618.11,4226.38 4592,4226.38 ; C506.1@4685.04,4151.57 4608.27,4151.57 4595.68,4164.16 4592.25,4164.16 4583.46,4172.96 4583.46,4217.83 4592,4226.38 ; 3754.72,3777.56 3582.44,3777.56 3468.72,3891.28 3468.72,3896.25 3722.86,4150.39 3762.08,4150.39 3770.87,4159.18 3770.87,4171.68 3774.39,4175.2 3811.8,4175.2
VREF_2V5: C307.2 C309.2 U301.9 U302.6 | length 475.6
  Top Layer w6: C309.2@2480.32,4251.97 2480.32,4288.2 2512,4319.88 U301.9@2555.94,4319.88 2555.12,4320.87 2616.14,4259.84 2620.08,4259.84 2622.05,4257.87 2624.02,4257.87 U302.6@2643.7,4238.19 2651.57,4230.32 2653.54,4230.32 2655.51,4228.35 2669.29,4228.35 2671.26,4226.38 2687.01,4226.38 2692.91,4220.47 2692.91,4143.7 2645.67,4096.46 2645.67,4072.83 C307.2@2643.7,4070.87
pads on no net: J100. J401.6 J401.8 U100.11 U100.12 U100.21 U301.6 U301.7 U401.2 U401.3 U401.4 U401.5 U401.6 U401.7 U401.8 U401.9 U401.10 U401.13 U401.14 U401.15 U401.16 U401.17 U401.18 U401.19 U401.20 U401.21 U401.22 U401.23 U401.28 U401.29 U401.32 U401.34 U401.38 U401.40 U401.41 U501.4 U502.5 U503.4 U504.4

## Polygon pours and split planes (outlines as drawn)
3.3V on L3_POWER "L3_POWER-3.3V" (solid, remove dead copper, pour order 1): 1011.81,3566.93 3818.9,3566.93 3818.9,4988.19 1011.81,4988.19
DVDD_3V3 on L3_POWER "L3_POWER-DVDD_3V3" (solid, remove dead copper, pour order 2): 3838.58,3566.93 4783.07,3566.93 4783.07,4988.19 3838.58,4988.19
GND on L2_GND "L2_GND-GND" (solid, remove dead copper, pour order 0): 1011.81,3566.93 4783.07,3566.93 4783.07,4988.19 1011.81,4988.19

## Keep-outs
Keep-Out Layer:
  rectangle: 3759.84,5000 4547.24,5153.54
  rectangle: 4035.43,4866.14 4271.65,5153.54

## Text inside footprints (layer, text, board x,y; h text height)
J100: Mechanical 13 "PCB EDGE" at 969.41,4994.8 h32 r180
U301: Top Overlay "*" at 2303.44,4509.16 h50; Mechanical 13 "*" at 2354.94,4456.95 h50
U401: Top 3D Body "as wide as possible" at 3993.46,5075.43 h17.72; Top 3D Body "as wide as possible" at 3843.74,4763.58 h17.72 r90; Top 3D Body "No ground pad" at 4050.95,4929.17 h17.72; Top Courtyard "Toplayer no ground pad" at 4043.66,4697.48 h11.81
U501: Top Overlay "*" at 4558.76,3917.52 h50 r180; Mechanical 13 "*" at 4585.99,3996.92 h50 r180